# Altium PCB JIG_TEST_FLEX_V1.0.PcbDoc (part 2 of 2)
Units mm, origin at the board's own origin, x right, y up, seen from the top; angles counter-clockwise.
Board outline 55 x 70 mm, 2 copper layers (Top Layer, Bottom Layer); 135 components, 71 nets, 349 pads, 291 vias.
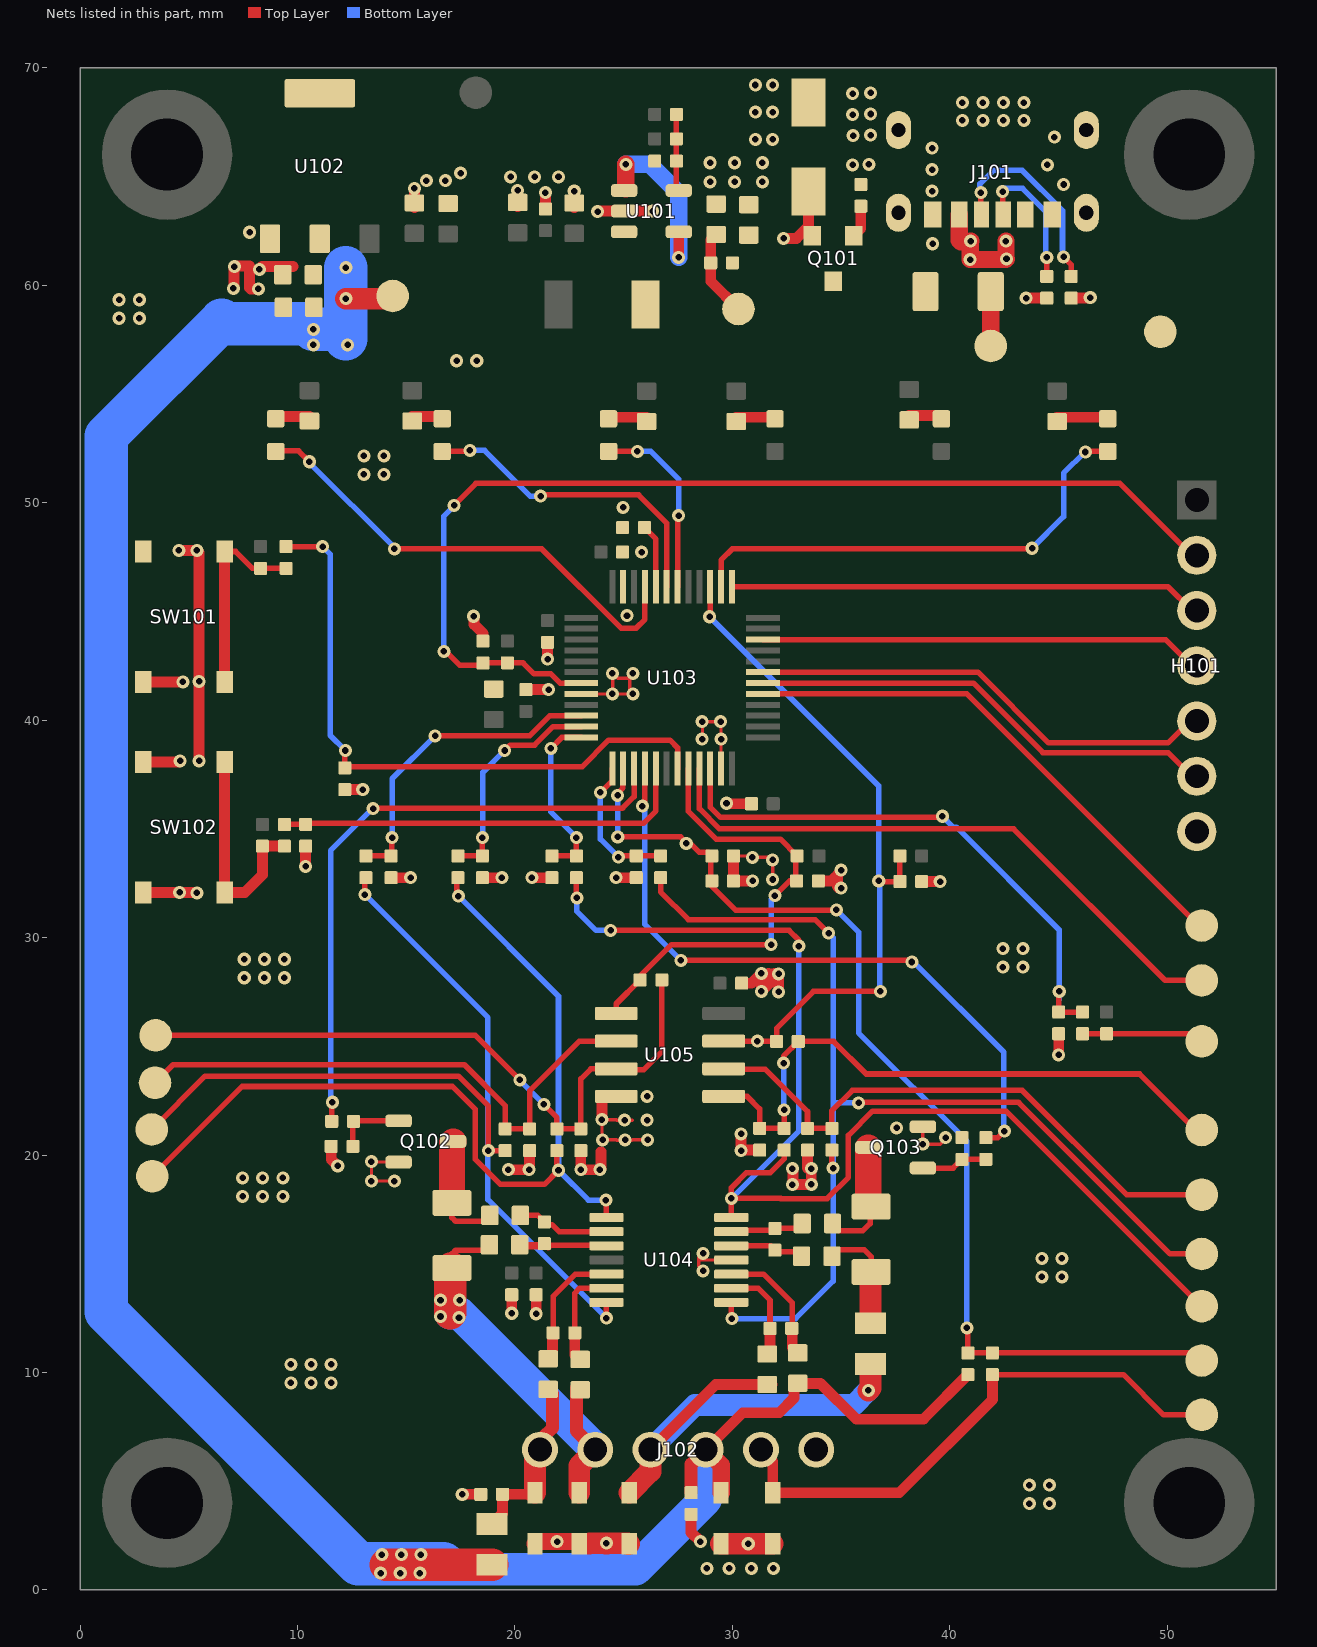
[diagram p2: the nets of this part, all layers, seen from the top]

## Via types
v1: diameter 0.6, hole 0.3, Top Layer to Bottom Layer, tented both sides, 291 vias

## Nets (pads, with @x,y where several pads share a name; then routed paths per layer and width w, separated by ;. In a path a pad name is that pad's centre, name@x,y a point inside that pad or via, vN(x,y) a via of type N, cw(c..) or ccw(c..) an arc to the next point about the centre after c; other vN are vias at no path point) (continued)
FAULT_LOOP_HALL_N: C139.1 R128.2 R139.2 U103.39 U105.7 | length 32.5
  Top Layer w0.254: v1(28.95,44.75) 28.975,44.775 U103.39@28.975,46.13 ; U105.7@29.595,25.235 v1(31.15,25.235) 32.015,25.235 R128.2@32.025,25.225 32.025,25.825 33.725,27.525 v1(36.8,27.525) ; v1(36.725,32.6) 36.75,32.575 C139.1@37.7,32.575 R139.2@37.7,33.75
  Bottom Layer w0.254: v1(28.95,44.75) 36.725,36.975 v1(36.725,32.6) 36.775,32.55 36.775,27.55 v1(36.8,27.525)
FAULT_PA_N: C133.1 R129.2 R130.2 U103.20 U105.1 | length 21.4
  Top Layer w0.254: U105.1@24.655,26.505 24.655,26.955 R129.2@25.75,28.05 25.75,28.225 27.2,29.675 v1(31.775,29.675) ; U103.20@27.975,37.77 27.975,35.8 29.25,34.525 32.2,34.525 R130.2@32.975,33.75 32.93,33.75 32.905,33.725 32.905,32.645 C133.1@32.95,32.6 32.625,32.6 v1(31.95,31.925)
  Bottom Layer w0.254: v1(31.775,29.675) 31.775,30.209 31.775,31.75 v1(31.95,31.925)
GND: C101.2 C103.2 C104.2 C105.2 C106.2 C107.2 C108.2 C109.2 C110.2 C111.2 C112.2 C113.2 C114.2 C115.2 C116.2 C117.2 C118.2 C119.2 C120.2 C122.2 C124.2 C126.2 C127.2 C128.2 C130.2 C131.2 C132.2 C133.2 C134.2 C135.2 C136.2 C137.2 C138.2 C139.2 C140.2 D101.2 D102.2 D103.2 D104.2 D105.2 D106.2 H101.7 J101.A12 J101.B12 J101.SH1 J101.SH2 J101.SH3 J101.SH4 J102.1 Q102.2 Q103.2 R102.2 R103.2 R104.2 R105.2 R109.1 R112.2 R115.2 R116.2 SW101.A SW101.B SW102.A SW102.B TP101.1 U101.2 U102.1 U103.8 U103.23 U103.47 U104.11 U105.4 | length 96.2
  Top Layer w0.15: v1(14.45,18.8) v1(13.4,18.8) v1(13.4,19.7) 13.425,19.675 Q102.2@14.65,19.675 ; U103.8@23.045,41.2 v1(25.425,41.2) 25.275,41.35 25.275,41.925 24.725,41.925 24.5,42.15 24.5,41.35 24.525,41.325 v1@24.45,41.25 ; 25.4,21.6 24.675,21.6 24.65,21.625 v1(24,21.625) 24,20.725 v1(24.025,20.7) 24.65,20.7 24.675,20.675 25.375,20.675 25.4,20.7 25.85,20.7 v1@25.875,20.675 ; v1@28.6,39.15 28.625,39.175 28.625,39.9 v1(28.6,39.925) v1(29.45,39.925) 29.475,39.9 v1(29.475,39.125) U103.23@29.475,37.77 ; v1(28.65,14.675) 28.45,14.875 28.45,15.15 ; v1(28.65,15.475) 28.45,15.275 28.45,15.15 ; U104.11@29.945,15.175 28.475,15.175 28.45,15.15 ; R112.2@30.05,33.75 30.7,33.75 30.775,33.825 v1(30.911,33.689) 31.736,33.689 v1(31.85,33.575) v1(31.85,32.668) ; Q103.2@38.755,21.3 38.755,20.505 v1(38.75,20.5) 39.55,20.5 39.8,20.75 v1(39.8,20.8)
  Top Layer w0.5: SW102.A@2.9,32.075 v1(4.575,32.075) 5.35,32.075 v1(5.375,32.05) ; SW102.B@2.9,38.075 4.55,38.075 v1(4.6,38.125) ; SW101.A@2.9,41.75 v1(4.725,41.75) ; v1(4.55,47.8) v1(5.375,47.8) 5.475,47.7 v1(5.475,41.775) v1(5.475,38.125) ; v1@7.05,59.9 7.075,59.925 7.075,60.85 7.1,60.875 7.8,60.875 7.8,59.875 7.85,59.825 v1(8.2,59.825) ; v1(8.25,60.725) 8.375,60.85 9.8,60.85 ; v1(10.375,33.275) C135.2@10.375,34.2 ; R115.2@11.55,20.4 11.55,19.8 v1(11.85,19.5) ; C136.2@12.175,36.8 v1(13,36.8) ; C122.2@14.3,32.75 v1(15.2,32.75) ; C109.2@15.375,63.575 v1(15.375,64.45) ; v1(17.575,4.4) C112.2@18.425,4.4 ; v1(18.101,44.774) 18.121,44.754 18.121,44.392 18.176,44.336 18.525,43.988 C119.2@18.525,43.625 ; C124.2@18.5,32.75 v1(19.4,32.75) ; v1(19.7,19.325) v1(20.65,19.325) 20.675,19.35 C134.2@20.675,20.2 ; v1(19.85,12.725) C126.2@19.85,13.575 ; C101.2@20.125,63.6 v1(20.125,64.35) ; C117.2@20.5,41.4 v1(21.55,41.4) ; v1(20.775,32.75) C130.2@21.7,32.75 ; v1(20.975,12.7) C127.2@20.975,13.575 ; C107.2@21.4,63.5 v1(21.4,64.25) ; v1(21.5,42.8) C116.2@21.5,43.575 ; C106.2@22.725,63.575 v1@22.725,64.35 ; C132.2@23.025,20.2 v1(23.025,19.325) v1(23.9,19.325) 23.95,19.375 23.95,20.15 ; v1(23.8,63.375) 23.825,63.4 U101.2@25.02,63.4 v1(26.325,63.4) ; v1(24,21.625) 24,22.695 U105.4@24.655,22.695 ; v1(24.65,32.75) C128.2@25.575,32.75 ; C113.2@28.1,3.475 28.1,2.65 v1(28.524,2.226) ; v1(29.725,36.175) 29.75,36.15 C115.2@30.875,36.15 ; R112.2@30.05,33.75 C120.2@30.05,32.6 v1(30.925,32.6) ; v1(30.4,20.975) v1(30.4,20.2) 30.425,20.225 C138.2@31.25,20.225 ; C131.2@30.425,27.9 30.875,27.9 v1(31.325,28.35) v1(31.325,27.525) 31.65,27.85 31.65,28.35 31.675,28.325 31.925,28.325 31.925,28.35 32.1,28.35 v1(32.125,28.325) ; v1(32.125,27.5) v1@32.125,28.275 ; v1(32.75,18.643) 32.75,18.725 32.775,18.75 v1@32.775,19.35 ; v1@32.775,18.643 33.618,18.643 v1(33.625,18.65) v1(33.625,19.375) 33.475,19.375 33.45,19.4 C140.2@33.45,20.225 ; D101.2@33.5,68.4 33.5,68.125 D101.2@33.95,67.675 ; C133.2@33.95,32.6 34.55,32.6 v1@35,33.05 ; v1(35,32.275) 34.9,32.275 34.825,32.35 34.825,32.875 v1@35,33.05 ; v1(35,33.1) v1@35,33.05 ; C139.2@38.7,32.575 v1(39.55,32.575) ; v1(43.5,59.4) R102.2@44.45,59.4 ; v1(45,24.6) C137.2@45,25.575 ; R103.2@45.575,59.4 46.425,59.4 v1(46.45,59.425)
  Top Layer w0.8: D102.2@20.925,2.127 21.027,2.228 22.848,2.228 D103.2@22.95,2.127 23.413,2.127
  Top Layer w1: 23.413,2.127 23.437,2.15 24.15,2.15 24.175,2.125 v1(24.2,2.15) ; v1@24.225,2.125 24.25,2.15 25.173,2.15 25.223,2.1 D104.2@25.25,2.127 ; D105.2@29.475,2.127 30.723,2.127 v1(30.725,2.125) 31.848,2.125 D106.2@31.85,2.127
  other v1: 28.825,0.991 29.845,0.991 30.865,0.991 31.885,0.991 21.938,2.228 43.65,3.975 44.575,3.975 43.65,4.825 44.575,4.825 9.7,9.525 10.625,9.525 11.55,9.525 9.7,10.375 10.625,10.375 11.55,10.375 44.225,14.4 45.15,14.4 44.225,15.25 45.15,15.25 7.475,18.1 8.4,18.1 9.325,18.1 7.475,18.95 8.4,18.95 9.325,18.95 32.75,19.375 25.063,20.7 26.1,20.7 37.55,21.25 25.037,21.6 26.075,21.6 26.075,22.7 7.55,28.15 8.475,28.15 9.4,28.15 42.43,28.642 43.355,28.642 7.55,29 8.475,29 9.4,29 42.43,29.492 43.355,29.492 28.6,39.125 24.475,41.2 24.475,42.15 25.425,42.15 25.15,44.802 25.825,47.725 24.975,49.775 13.05,51.3 13.975,51.3 13.05,52.15 13.975,52.15 17.316,56.521 18.241,56.521 1.8,58.475 2.725,58.475 1.8,59.325 2.725,59.325 7.05,59.85 7.1,60.85 39.2,61.9 7.8,62.43 22.725,64.325 39.175,64.325 45.225,64.625 28.975,64.75 30.1,64.75 31.375,64.75 15.925,64.8 16.8,64.8 19.8,64.975 20.9,64.975 22,64.975 17.5,65.15 39.175,65.312 35.525,65.525 44.475,65.525 36.275,65.55 28.975,65.625 30.1,65.625 31.375,65.625 39.175,66.3 31.05,66.7 31.85,66.7 44.8,66.8 35.55,66.875 36.35,66.9 40.575,67.575 41.517,67.575 42.458,67.575 43.4,67.575 35.525,67.842 36.35,67.867 31.05,67.95 31.85,67.95 40.575,68.387 41.517,68.387 42.458,68.387 43.4,68.387 35.525,68.808 36.35,68.833 31.05,69.2 31.85,69.2
HALL_ADC: C120.1 R110.2 R111.1 R112.1 TP102.1 U103.14 | length 49.3
  Top Layer w0.254: v1(24.715,36.537) 24.715,36.631 24.962,36.879 24.962,37.757 U103.14@24.975,37.77 ; v1(24.725,34.625) 27.612,34.625 27.875,34.362 v1(27.875,34.325) 28.069,34.325 28.471,33.923 28.877,33.923 R112.1@29.05,33.75 29.005,33.705 29.005,32.645 C120.1@29.05,32.6 C120.1@29.005,32.555 ; C120.1@28.966,32.434 30.152,31.248 33.264,31.248 34.748,31.248 v1(34.775,31.275) ; v1(40.775,12.05) 40.825,12 R110.2@40.825,10.9 R111.1@41.95,10.9 51.225,10.9 TP102.1@51.575,10.55
  Bottom Layer w0.254: v1(24.715,36.537) 24.725,36.527 v1(24.725,34.625) ; v1(34.775,31.275) 35.8,30.25 35.8,25.616 40.775,20.641 v1(40.775,12.05)
HALL_EN: R114.2 U103.16 | length 30.8
  Top Layer w0.254: v1(25.854,36.045) 25.854,36.139 25.975,36.26 U103.16@25.975,37.77 ; v1(27.625,28.95) 38.25,28.95 v1(38.25,28.875) ; R114.2@41.65,20.8 42.2,20.8 v1(42.5,21.1)
  Bottom Layer w0.254: v1(25.854,36.045) 25.975,35.925 25.975,30.6 v1(27.625,28.95) ; v1(38.25,28.875) 38.325,28.875 42.475,24.725 v1@42.475,21.103
HALL_LED: LED103.2 U103.43 | length 14.7
  Top Layer w0.254: LED103.2@16.652,52.35 17.875,52.35 v1(17.925,52.4) ; v1(21.175,50.3) 21.227,50.352 25.682,50.352 26.975,49.059 U103.43@26.975,46.13
  Bottom Layer w0.254: v1(17.925,52.4) 18.6,52.4 20.7,50.3 v1(21.175,50.3)
HALL_OUT: D106.1 J102.2 R111.2 TP103.1 | length 25.6
  Top Layer w0.254: R111.2@41.95,9.9 47.975,9.9 49.825,8.05 TP103.1@51.575,8.05
  Top Layer w0.5: J102.2@31.31,6.45 31.85,5.91 D106.1@31.85,4.471 37.671,4.471 41.95,8.75 R111.2@41.95,9.9
IN_A+: C132.1 R127.1 R129.1 TP110.1 U105.3 | length 31.5
  Top Layer w0.254: TP110.1@3.475,25.5 18.175,25.5 v1(20.225,23.45) ; v1(21.325,22.325) 21.925,21.725 R127.1@21.925,21.2 C132.1@23.025,21.2 23.025,23.5 23.49,23.965 U105.3@24.655,23.965 24.695,23.925 25.925,23.925 26.75,24.75 R129.1@26.75,28.05
  Bottom Layer w0.254: v1(20.225,23.45) 20.225,23.425 v1(21.325,22.325)
IN_A-: C134.1 R134.1 TP112.1 U105.2 | length 26.1
  Top Layer w0.254: TP112.1@3.45,23.325 4.275,24.15 17.675,24.15 19.55,22.275 R134.1@19.55,21.2 C134.1@20.675,21.2 20.675,22.95 22.96,25.235 U105.2@24.655,25.235
IN_B+: C138.1 R128.1 R138.1 TP113.1 U105.5 | length 28.2
  Top Layer w0.254: U105.5@29.595,22.695 30.68,22.695 31.25,22.125 C138.1@31.25,21.225 R138.1@32.375,21.225 v1(32.373,22.075) v1(32.373,22.075) ; v1(32.35,24.225) 32.35,24.55 R128.1@33.025,25.225 34.65,25.225 36.15,23.725 48.725,23.725 TP113.1@51.3,21.15
  Bottom Layer w0.254: v1(32.35,24.225) 32.35,22.098 v1(32.373,22.075)
IN_B-: C140.1 R140.1 TP114.1 U105.6 | length 26.6
  Top Layer w0.254: U105.6@29.595,23.965 29.61,23.95 31.5,23.95 33.45,22 C140.1@33.45,21.225 R140.1@34.575,21.225 34.575,22.041 35.509,22.975 43.325,22.975 48.125,18.175 TP114.1@51.425,18.175
INA_IN_1+: C123.1 RS103.1 U104.3 | length 5
  Top Layer w0.254: RS103.1@20.225,15.775 21.025,15.775 C123.1@21.05,15.8 ; RS103.1@20.225,15.875 RS103.1@20.313,15.787 ; RS103.1@20.313,15.862 21.287,15.862 C123.1@21.35,15.925 21.535,15.74 21.647,15.853 24.177,15.853 U104.3@24.205,15.825
INA_IN_1-: C123.2 RS104.1 U104.2 | length 4.4
  Top Layer w0.254: RS104.1@20.246,17.221 21.054,17.221 C123.2@21.35,16.925 ; C123.2@21.246,16.904 21.35,16.8 21.7,16.8 22.025,16.475 U104.2@24.205,16.475
INA_IN_2+: C121.1 RS101.1 U104.5 | length 5.7
  Top Layer w0.254: C121.1@21.75,11.825 21.75,13.5 22.775,14.525 U104.5@24.205,14.525
  Top Layer w0.5: RS101.1@21.725,10.725 21.725,11.8 C121.1@21.75,11.825
INA_IN_2-: C121.2 RS102.1 U104.6 | length 4.5
  Top Layer w0.254: C121.2@22.75,11.825 22.75,13.65 22.975,13.875 U104.6@24.205,13.875
  Top Layer w0.5: C121.2@22.75,11.825 22.75,10.8 RS102.1@22.825,10.725
INA_IN_3+: C125.1 RS105.1 U104.10 | length 5.8
  Top Layer w0.254: U104.10@29.945,14.525 31.425,14.525 32.75,13.2 C125.1@32.75,12
  Top Layer w0.5: C125.1@32.75,12 32.75,11.15 RS105.1@33,10.9
INA_IN_3-: C125.2 RS106.1 U104.9 | length 4.5
  Top Layer w0.254: U104.9@29.945,13.875 31.175,13.875 31.725,13.325 C125.2@31.725,11.975
  Top Layer w0.5: RS106.1@31.725,10.875 C125.2@31.725,11.975
INA_IN_4+: C129.1 RS107.1 U104.12 | length 3.5
  Top Layer w0.254: U104.12@29.945,15.825 31.75,15.825 C129.1@31.95,15.625 31.99,15.665 32.104,15.55 RS107.1@33.317,15.55
INA_IN_4-: C129.2 RS108.1 U104.13 | length 3.5
  Top Layer w0.254: U104.13@29.945,16.475 30.02,16.55 C129.2@32.025,16.55 ; C129.2@31.951,16.626 33.295,16.626 RS108.1@33.316,16.647
LOOP_1V8_A: 102.1 C110.1 C111.1 C113.1 D105.1 J102.3 R106.1 R110.1 RS105.2 U102.2 U102.4 | length 120
  Top Layer w0.5: J102.3@28.77,6.45 30.47,8.15 32.15,8.15 32.825,8.825 32.825,9.5 34.05,9.5 35.7,7.85 38.775,7.85 R110.1@40.825,9.9
  Top Layer w0.6: C113.1@28.1,4.475 28.1,5.78 J102.3@28.77,6.45
  Top Layer w0.8: J102.3@28.77,6.45 29.475,5.745 D105.1@29.475,4.471
  Top Layer w1: v1(12.225,59.375) 14.25,59.375 102.1@14.375,59.5
  Top Layer w1.5: 14.06,1.165 R106.1@18.95,1.165
  Bottom Layer w1.5: 6.525,58.375 6.675,58.225 ; 16.7,1.2 16.95,0.95 25.55,0.95 28.77,4.17 J102.3@28.77,6.45
  Bottom Layer w2: 6.525,58.375 1.2,53.05 1.2,12.8 12.8,1.2 15.2,1.2 16.05,1.2 16.7,1.2 ; 6.675,58.225 10.463,58.225 v1(10.725,57.962) 11.962,57.962 12.225,58.225 ; v1@12.225,57.525 v1(12.225,59.375) v1(12.225,60.8)
  other v1: 13.825,0.775 14.725,0.775 15.625,0.775 13.875,1.625 14.775,1.625 15.675,1.625 10.725,57.25 12.3,57.25
LOOP_1V8_B: D104.1 J102.4 R108.2 RS106.2 | length 21.6
  Top Layer w0.5: J102.4@26.23,6.45 29.23,9.45 RS106.2@31.829,9.45
  Top Layer w1: D104.1@25.25,4.471 26.23,5.451 J102.4@26.23,6.45 ; v1(36.25,9.175) 36.35,9.275 R108.2@36.35,10.39
  Bottom Layer w1: J102.4@26.23,6.45 28.275,8.495 28.275,8.5 35.4,8.5 35.575,8.5 v1(36.25,9.175)
MCU_RX: H101.5 U103.31 | length 21.7
  Top Layer w0.254: U103.31@31.405,42.2 41.282,42.2 44.532,38.95 50.025,38.95 51.03,39.955 H101.5@51.35,39.955
MCU_TX: H101.6 U103.30 | length 21.4
  Top Layer w0.254: U103.30@31.405,41.7 41.075,41.7 44.275,38.5 50.035,38.5 H101.6@51.075,37.46
NetC102_2: C102.2 R101.2 R105.1 U101.5 | length 3.5
  Top Layer w0.254: R101.2@27.425,67.85 C102.2@27.425,66.725 R105.1@27.425,65.7 27.425,64.455 U101.5@27.53,64.35
NetF101_2: F101.2 Q101.3
NetJ101_A5: J101.A5 R102.1 | length 6.2
  Top Layer w0.254: J101.A5@42.425,63.22 v1(42.425,64.3) ; R102.1@44.45,60.4 v1(44.45,61.275)
  Bottom Layer w0.254: v1@42.376,64.45 43.338,64.45 44.4,63.388 44.4,61.575
NetJ101_B5: J101.B5 R103.1 | length 8.8
  Top Layer w0.254: J101.B5@41.425,63.22 v1(41.425,64.25) ; v1@45.225,61.29 45.575,60.94 R103.1@45.575,60.4
  Bottom Layer w0.254: 41.375,64.55 41.375,64.65 42,65.275 43.325,65.275 45.175,63.425 45.175,61.6
  other v1: 45.225,61.3
NetL101_1: L101.1 U101.3
NetLED101_1: LED101.1 R119.2 | length 1.6
  Top Layer w0.5: LED101.1@9,53.85 9.1,53.95 R119.2@10.55,53.95
NetLED102_1: LED102.1 R120.2 | length 1.9
  Top Layer w0.254: R120.2@26.05,53.925 R120.2@26.167,53.925
  Top Layer w0.5: LED102.1@24.303,53.85 24.378,53.925 R120.2@26.05,53.925
NetLED103_1: LED103.1 R121.2 | length 1.5
  Top Layer w0.254: R121.2@15.275,53.95 R121.2@15.325,54
  Top Layer w0.5: R121.2@15.275,53.95 16.552,53.95 LED103.1@16.652,53.85
NetLED104_1: LED104.1 R123.2 | length 1.8
  Top Layer w0.5: R123.2@30.175,53.925 31.88,53.925 LED104.1@31.955,53.85
NetLED105_1: PASS.1 R124.2 | length 2.5
  Top Layer w0.254: PASS.1@47.184,53.925 PASS.1@47.259,53.85
  Top Layer w0.5: R124.2@44.925,53.925 47.184,53.925 PASS.1@47.259,53.85
NetLED106_1: LED106.1 R125.2 | length 1.8
  Top Layer w0.254: R125.2@38.125,54 R125.2@38.275,53.85
  Top Layer w0.5: R125.2@38.125,54 39.457,54 LED106.1@39.607,53.85
NetQ101_1: Q101.1 R104.1 | length 1.5
  Top Layer w0.5: Q101.1@35.575,62.275 35.9,62.6 R104.1@35.9,63.625
NetQ102_1: Q102.1 R113.1 R115.1 | length 3.2
  Top Layer w0.254: R115.1@12.55,20.4 12.55,21.525 R113.1@12.575,21.55 12.6,21.575 Q102.1@14.65,21.575
NetQ103_1: Q103.1 R114.1 R116.1 | length 3.1
  Top Layer w0.254: Q103.1@38.755,19.4 40.15,19.4 40.35,19.6 R116.1@40.55,19.8 R114.1@41.65,19.8
NetR109_2: R109.2 U103.44 | length 2.9
  Top Layer w0.254: R109.2@25.95,48.85 26.475,48.325 U103.44@26.475,46.13
NetR131_2: R131.2 R135.1 SW101.C SW101.D | length 9.1
  Top Layer w0.254: SW101.D@6.65,47.75 7.15,47.75 7.925,46.975 R131.2@8.3,46.975 R135.1@9.475,46.975
  Top Layer w0.5: SW101.C@6.65,41.75 SW101.D@6.65,47.75
NetR132_2: R132.2 R137.1 SW102.C SW102.D | length 10.4
  Top Layer w0.5: SW102.D@6.65,38.075 SW102.C@6.65,32.075 7.575,32.075 8.388,32.888 R132.2@8.388,34.2 R137.1@9.4,34.2
NetR133_2: R133.2 R136.1 TP111.1 | length 5.6
  Top Layer w0.254: R136.1@46.1,25.575 R133.2@47.2,25.575 51.225,25.575 TP111.1@51.575,25.225
NetTP104_1: TP104.1 U103.29 | length 24.4
  Top Layer w0.254: U103.29@31.405,41.2 40.775,41.2 TP104.1@51.425,30.55
NetTP105_1: TP105.1 U103.21 | length 28.2
  Top Layer w0.254: U103.21@28.475,37.77 28.475,35.925 29.4,35 42.925,35 49.9,28.025 TP105.1@51.575,28.025
NRST: C119.1 H101.2 R107.2 U103.7 | length 49.6
  Top Layer w0.254: v1(16.733,43.155) 16.827,43.155 17.457,42.525 17.775,42.525 18.425,42.525 C119.1@18.525,42.625 18.532,42.632 R107.2@19.65,42.632 20.368,42.632 20.875,42.125 21.65,42.125 22.075,41.7 U103.7@23.045,41.7 ; v1(17.2,49.875) 18.202,50.877 20.936,50.877 21.414,50.877 47.818,50.877 H101.2@51.075,47.62
  Bottom Layer w0.254: v1(16.733,43.155) 16.733,49.379 17.2,49.846 v1(17.2,49.875)
OUT_DUT_HALL: R122.2 R140.2 TP108.1 U104.8 | length 51.9
  Top Layer w0.254: R122.2@26.7,32.75 26.7,32.1 27.975,30.825 33.8,30.825 v1(34.425,30.2) ; U104.8@29.945,13.225 29.945,12.505 v1(29.975,12.475) ; R140.2@34.575,20.225 34.575,19.45 v1(34.625,19.4) ; v1(35.8,22.398) 35.825,22.423 43.152,22.423 50.125,15.45 TP108.1@51.425,15.45
  Bottom Layer w0.254: v1(29.975,12.475) 32.9,12.475 34.625,14.2 v1(34.625,19.4) 34.625,22.398 ; v1(34.425,30.2) 34.625,30 34.625,22.398 ; v1(35.8,22.398) 34.625,22.398
OUT_DUT_PA: R117.2 R134.2 TP106.1 U104.7 | length 45.5
  Top Layer w0.254: TP106.1@3.3,21.175 5.75,23.625 17.4,23.625 18.775,22.25 v1(18.775,20.2) R134.2@19.55,20.2 ; v1@13.098,31.923 13.098,31.968 v1(13.101,31.971) 13.101,32.705 R117.2@13.146,32.75 ; v1(24.2,12.5) 24.205,12.505 U104.7@24.205,13.225
  Bottom Layer w0.254: v1(13.101,31.971) 18.75,26.322 18.75,20.175 18.75,17.95 v1(24.2,12.5)
OUT_SH_HALL: R126.2 R138.2 TP109.1 U104.14 | length 58.2
  Top Layer w0.254: v1@22.825,31.908 R126.2@22.825,32.75 ; v1(24.4,30.325) 32.6,30.325 33.05,29.875 v1(33.05,29.6) ; U104.14@29.945,17.125 v1(29.945,18.005) ; R138.2@32.375,20.225 32.375,19.825 31.741,19.191 30.641,19.191 29.945,18.495 v1(29.945,18.005) ; TP109.1@51.55,13.05 49.1,15.5 42.581,22.019 36.444,22.019 35.325,20.9 35.325,18.975 34.348,17.998 32.23,17.998 32.223,18.005 v1(29.945,18.005)
  Bottom Layer w0.254: v1(22.85,31.825) 22.85,31.2 23.725,30.325 v1(24.4,30.325) ; v1(29.945,18.005) 33.05,21.11 v1(33.05,29.6)
OUT_SH_PA: R118.2 R127.2 TP107.1 U104.1 | length 43.8
  Top Layer w0.254: TP107.1@3.325,19.025 7.45,23.15 17.125,23.15 18.175,22.1 18.175,19.8 19.325,18.65 21.35,18.65 v1(22,19.3) 21.925,19.375 R127.2@21.925,20.2 ; R118.2@17.375,32.75 17.33,32.705 17.33,31.925 17.355,31.9 v1(17.4,31.9) ; v1(24.175,17.925) 24.205,17.895 U104.1@24.205,17.125
  Bottom Layer w0.254: v1(17.4,31.9) 22,27.3 v1(22,19.3) 23.375,17.925 v1(24.175,17.925)
PA1: C112.1 D102.1 J102.6 R106.2 RS101.2 | length 8.3
  Top Layer w0.5: R106.2@18.95,3.035 19.425,3.51 C112.1@19.425,4.4 20.854,4.4 D102.1@20.925,4.471
  Top Layer w0.6: J102.6@21.15,6.45 21.3,6.6 21.3,7.025 21.725,7.45 21.725,9.025 RS101.2@21.525,9.225
  Top Layer w1: D102.1@20.925,4.471 20.925,6.225 J102.6@21.15,6.45
PA2: D103.1 J102.5 RS102.2 RS103.2 RSH101.2 | length 19.6
  Top Layer w0.254: RSH101.2@17.1,14.8 17.1,15.45 17.275,15.625 18.575,15.625 RS103.2@18.825,15.875 ; RS103.2@18.875,16.025 RS103.2@19.025,15.875
  Top Layer w0.6: RS102.2@22.825,9.275 22.825,9.2 22.825,7.315 J102.5@23.69,6.45
  Top Layer w1: D103.1@22.95,4.471 22.95,5.71 J102.5@23.69,6.45
  Top Layer w1.5: 17.025,12.725 17.025,14.725 RSH101.2@17.1,14.8
  Bottom Layer w1.5: 17.025,12.725 17.45,12.725 23.69,6.485 J102.5@23.69,6.45
  other v1: 17.425,12.525 16.575,12.575 16.575,13.325 17.45,13.325
PA_EN: R113.2 U103.15 | length 28.8
  Top Layer w0.254: R113.2@11.575,21.55 11.575,22.4 v1(11.6,22.425) ; v1(13.475,35.925) 13.5,35.95 14.308,35.95 24.943,35.95 25.475,36.482 U103.15@25.475,37.77
  Bottom Layer w0.254: v1(11.6,22.425) 11.525,22.5 11.525,34 13.45,35.925 v1(13.475,35.925)
PA_LED: LED102.2 U103.42 | length 8.7
  Top Layer w0.254: LED102.2@24.575,52.35 v1(25.625,52.35) ; U103.42@27.475,46.13 27.475,49.35 v1(27.525,49.4)
  Bottom Layer w0.254: v1(27.525,49.4) 27.525,51.075 26.25,52.35 v1@25.821,52.35 ; v1@25.821,52.35 25.723,52.448 v1(25.625,52.35) v1@25.821,52.35
PASS_LED: PASS.2 U103.38 | length 22.2
  Top Layer w0.254: U103.38@29.475,46.13 29.475,47.35 30,47.875 43.75,47.875 v1(43.775,47.9) ; v1(46.225,52.325) 46.25,52.35 PASS.2@47.259,52.35
  Bottom Layer w0.254: v1(43.775,47.9) 45.225,49.35 45.225,51.35 46.2,52.325 v1(46.225,52.325)
READY_LED: LED101.2 U103.45 | length 22.1
  Top Layer w0.254: LED101.2@9,52.375 10.05,52.375 v1(10.549,51.876) ; v1(14.45,47.875) 21.225,47.875 24.875,44.225 25.575,44.225 25.975,44.625 U103.45@25.975,46.13
  Bottom Layer w0.254: v1(10.549,51.876) 10.549,51.826 14.45,47.925 v1(14.45,47.875)
SHUNT_HALL+: R108.1 RS107.2 RSH102.2 | length 5.3
  Top Layer w0.254: RS107.2@34.375,15.35 RS107.2@34.55,15.525 ; RS107.2@34.575,15.35 34.875,15.65 36.05,15.65 36.375,15.325 RSH102.2@36.375,14.625
  Top Layer w1: R108.1@36.35,12.26 RSH102.2@36.35,14.6
SHUNT_HALL-: Q103.3 RS108.2 RSH102.1 | length 5.8
  Top Layer w0.254: RS108.2@34.4,16.85 RS108.2@34.571,16.679 ; RS108.2@34.6,16.85 34.925,16.525 36,16.525 36.325,16.85 36.325,17.575 RSH102.1@36.375,17.625
  Top Layer w1.2: Q103.3@36.245,20.35 36.245,17.755 RSH102.1@36.375,17.625
SHUNT_PA-: Q102.3 RS104.2 RSH101.1 | length 5.6
  Top Layer w0.254: RSH101.1@17.1,17.8 17.1,17.125 17.275,16.95 18.575,16.95 RS104.2@18.846,17.221 ; RS104.2@18.917,17.092 RS104.2@19.046,17.221
  Top Layer w1.2: RSH101.1@17.1,17.8 17.1,20.565 Q102.3@17.16,20.625
START_BUTTON: C136.1 R135.2 U103.19 | length 29.2
  Top Layer w0.254: R135.2@9.475,47.975 v1(11.15,47.975) ; C136.1@12.175,37.8 C136.1@12.175,37.85 ; v1(12.2,38.6) 12.175,38.575 C136.1@12.175,37.85 ; U103.19@27.475,37.77 27.475,38.725 27.125,39.075 24.309,39.075 23.084,37.85 C136.1@12.175,37.85
  Bottom Layer w0.254: v1(11.15,47.975) 11.5,47.625 11.5,39.3 v1(12.2,38.6)
SW2: C135.1 R137.2 U103.17 | length 19.3
  Top Layer w0.254: R137.2@9.4,35.2 C135.1@10.375,35.2 ; C135.1@10.375,35.25 25.9,35.25 26.475,35.825 U103.17@26.475,37.77
SW3: C137.1 R136.2 U103.22 | length 25.4
  Top Layer w0.254: U103.22@28.975,37.77 28.975,36 29.45,35.525 39.598,35.525 v1(39.65,35.577) ; v1(45.025,27.525) 45,27.5 C137.1@45,26.575 R136.2@46.1,26.575
  Bottom Layer w0.254: v1(39.65,35.577) 40.147,35.08 40.295,35.08 45.025,30.35 45.025,27.165
SWCLK: H101.3 U103.37 | length 21.5
  Top Layer w0.254: U103.37@29.975,46.13 50.025,46.13 H101.3@51.075,45.08
SWDIO: H101.4 U103.34 | length 20.2
  Top Layer w0.254: U103.34@31.405,43.7 49.915,43.7 H101.4@51.075,42.54
V_BUS: F101.1 J101.A9 J101.B9 V_BUS101.1 | length 7.6
  Top Layer w0.8: J101.A9@40.43,63.245 40.43,62.07 40.5,62 v1@40.925,62 ; V_BUS101.1@41.875,57.2 F101.1@41.875,59.7 ; v1(42.575,62.025) 42.575,61.225 v1(42.6,61.2) 42.575,61.175 v1(40.925,61.175) v1@40.925,62 ; v1@40.925,62 v1(40.95,62.025) v1@40.925,62
V_DUT_HALL: C128.1 R122.1 U103.13 | length 6.6
  Top Layer w0.254: v1(23.925,36.675) 24.475,37.225 U103.13@24.475,37.77 ; v1(24.75,33.7) 24.8,33.75 C128.1@25.575,33.75 R122.1@26.7,33.75
  Bottom Layer w0.254: v1(23.925,36.675) 23.925,34.525 v1(24.75,33.7)
V_DUT_PA: C122.1 R117.1 U103.10 | length 14.6
  Top Layer w0.254: R117.1@13.146,33.75 C122.1@14.3,33.75 14.325,33.775 14.325,34.573 v1(14.35,34.598) ; v1(16.325,39.275) 20.675,39.275 21.6,40.2 U103.10@23.045,40.2
  Bottom Layer w0.254: v1(14.35,34.598) 14.35,37.3 v1(16.325,39.275)
V_IN: C103.1 C104.1 C105.1 D101.1 Q101.2 U101.1 U101.4 VIN101.1 | length 15.4
  Top Layer w0.5: U101.1@25.02,64.35 U101.1@25.1,64.43 ; v1(27.525,61.275) 27.53,61.28 U101.4@27.53,62.45 ; C105.1@29.25,62.325 29,62.075 C104.1@29,61.025 29,60.175 VIN101.1@30.275,58.9 ; v1(32.35,62.15) 32.95,62.15 33.5,62.7 D101.1@33.5,64.3
  Top Layer w0.8: U101.1@25.1,64.43 v1(25.1,65.55)
  Bottom Layer w0.8: v1(25.1,65.55) 26.2,65.55 27.525,64.225 v1(27.525,61.275)
V_SH_HALL: C130.1 R126.1 U103.12 | length 8.2
  Top Layer w0.254: v1(21.65,38.7) 22.15,39.2 U103.12@23.045,39.2 ; C130.1@21.7,33.75 R126.1@22.825,33.75 v1(22.825,34.598)
  Bottom Layer w0.254: v1(21.65,38.7) 21.65,35.773 v1(22.825,34.598)
V_SH_PA: C124.1 R118.1 U103.11 | length 10.4
  Top Layer w0.254: R118.1@17.375,33.75 C124.1@18.5,33.75 v1(18.5,34.598) ; v1(19.525,38.6) 19.775,38.85 20.9,38.85 21.75,39.7 U103.11@23.045,39.7
  Bottom Layer w0.254: v1(18.5,34.598) 18.525,34.623 18.525,37.6 v1(19.525,38.6)
pads on no net: U103.2 U103.3 U103.4 U103.5 U103.6 U103.18 U103.25 U103.26 U103.27 U103.28 U103.32 U103.33 U103.35 U103.36 U103.46

## Polygon pours and split planes (outlines as drawn)
GND on Top Layer "GND_L01_P008" (solid, remove dead copper, pour order 8): 0,70 0,0 55,0 55,70
3V3 on Top Layer "3V3_L01_P009" (solid, remove dead copper, pour order 9): 23.125,58.075 21.275,58.075 21.275,60.675 20.775,61.175 12.775,61.175 12.775,62.775 23.125,62.775
LOOP_1V8_A on Top Layer "LOOP_1V8_A_L01_P013" (solid, pour order 13): 0,70 0,61.3 14.55,61.3 14.525,61.325 14.525,70
LOOP_1V8_A on Top Layer "LOOP_1V8_A_L01_P015" (solid, remove dead copper, pour order 15): 12.613,62.775 12.6,62.762 12.6,56.35 10.325,56.35 10.325,61.575 10.325,62.775
V_BUS on Top Layer "V_BUS_L01_P000" (solid, remove dead copper, pour order 0): 40.775,62.75 40.775,62.5 40.895,62.38 42.976,62.38 43.075,62.479 43.075,62.775 43.825,62.775 43.825,61.425 42.925,60.525 40.8,60.525 40.025,61.3 40.025,62.75
NetL101_1 on Top Layer "NETL101_1_L01_P005" (solid, pour order 5): 25.625,62.725 25.625,62 26.625,61 26.625,58.05 24.975,58.05 24.975,60.675 24.4,61.275 24.4,61.3 24.4,62.725
V_IN on Top Layer "V_IN_L01_P003" (solid, remove dead copper, pour order 3): 26.935,61.6 34.1,61.6 34.1,62.7 26.935,62.7
NetF101_2 on Top Layer "NETF101_2_L01_P001" (solid, pour order 1): 39.375,60.625 33.825,60.625 33.821,60.621 33.821,58.85 39.375,58.85 39.375,60.6
V_IN on Top Layer "V_IN_L01_P002" (solid, pour order 2): 34.075,62.7 34.075,62.9 34.275,63.1 34.275,64.125 32.725,64.125 32.725,62.7
GND on Bottom Layer "GND_L02_P007" (solid, remove dead copper, pour order 7): 0,70 55,70 55,0 0,0
3V3 on Bottom Layer "3V3_L02_P014" (solid, remove dead copper, pour order 14): 14.925,61.175 19.925,61.175 19.925,62.775 14.925,62.775

## Keep-outs
Keep-Out Layer:
  the board outline again, w0.1

## Silkscreen, mask and mechanical layers (free items; w line width, h text height)
Top Overlay:
  text "3V3" at 44.55,49.639 h1.2
  text "START" at 2.225,49 h1
  text "NRST" at 44.55,47.447 h1.2
  text "SWCLK" at 44.55,44.954 h1.2
  text "SWDIO" at 44.55,42.461 h1.2
  text "MCU_TX" at 44.55,39.672 h1.2
  text "MCU_RX" at 44.55,36.933 h1.2
  text "GND" at 44.55,34.489 h1.2
  text "BT1" at 3.45,29.725 h1
  text ".PA1" at 8.425,3.85 h1.5 r90
  text ".PA2" at 9.994,3.85 h1.5 r90
  text ".LOOP_1V8B" at 11.841,3.85 h1.5 r90
  text ".LOOP_1V8_A" at 13.688,3.85 h1.5 r90
  text ".HALL_OUT" at 15.536,3.85 h1.5 r90
  text ".GND" at 17.133,3.85 h1.5 r90
  text "JIG_TEST_FLEX REV 1.0" at 32.55,0.825 h1.52

## Text inside footprints (layer, text, board x,y; h text height)
D101: Top Overlay "*" at 32.85,61.8 h1.27 r90